# Altium PCB HFPB_01-PCB.PcbDoc (part 2 of 5)
Units mm, origin at the board's own origin, x right, y up, seen from the top; angles counter-clockwise.
Board outline 125 x 200 mm, 8 copper layers (Top Layer, Signal Layer 1, Signal Layer 2, Signal Layer 3, Signal Layer 4, Signal Layer 5, Signal Layer 6, Bottom Layer), stack 1.53 mm thick; 382 components, 179 nets, 1080 pads, 272 vias.
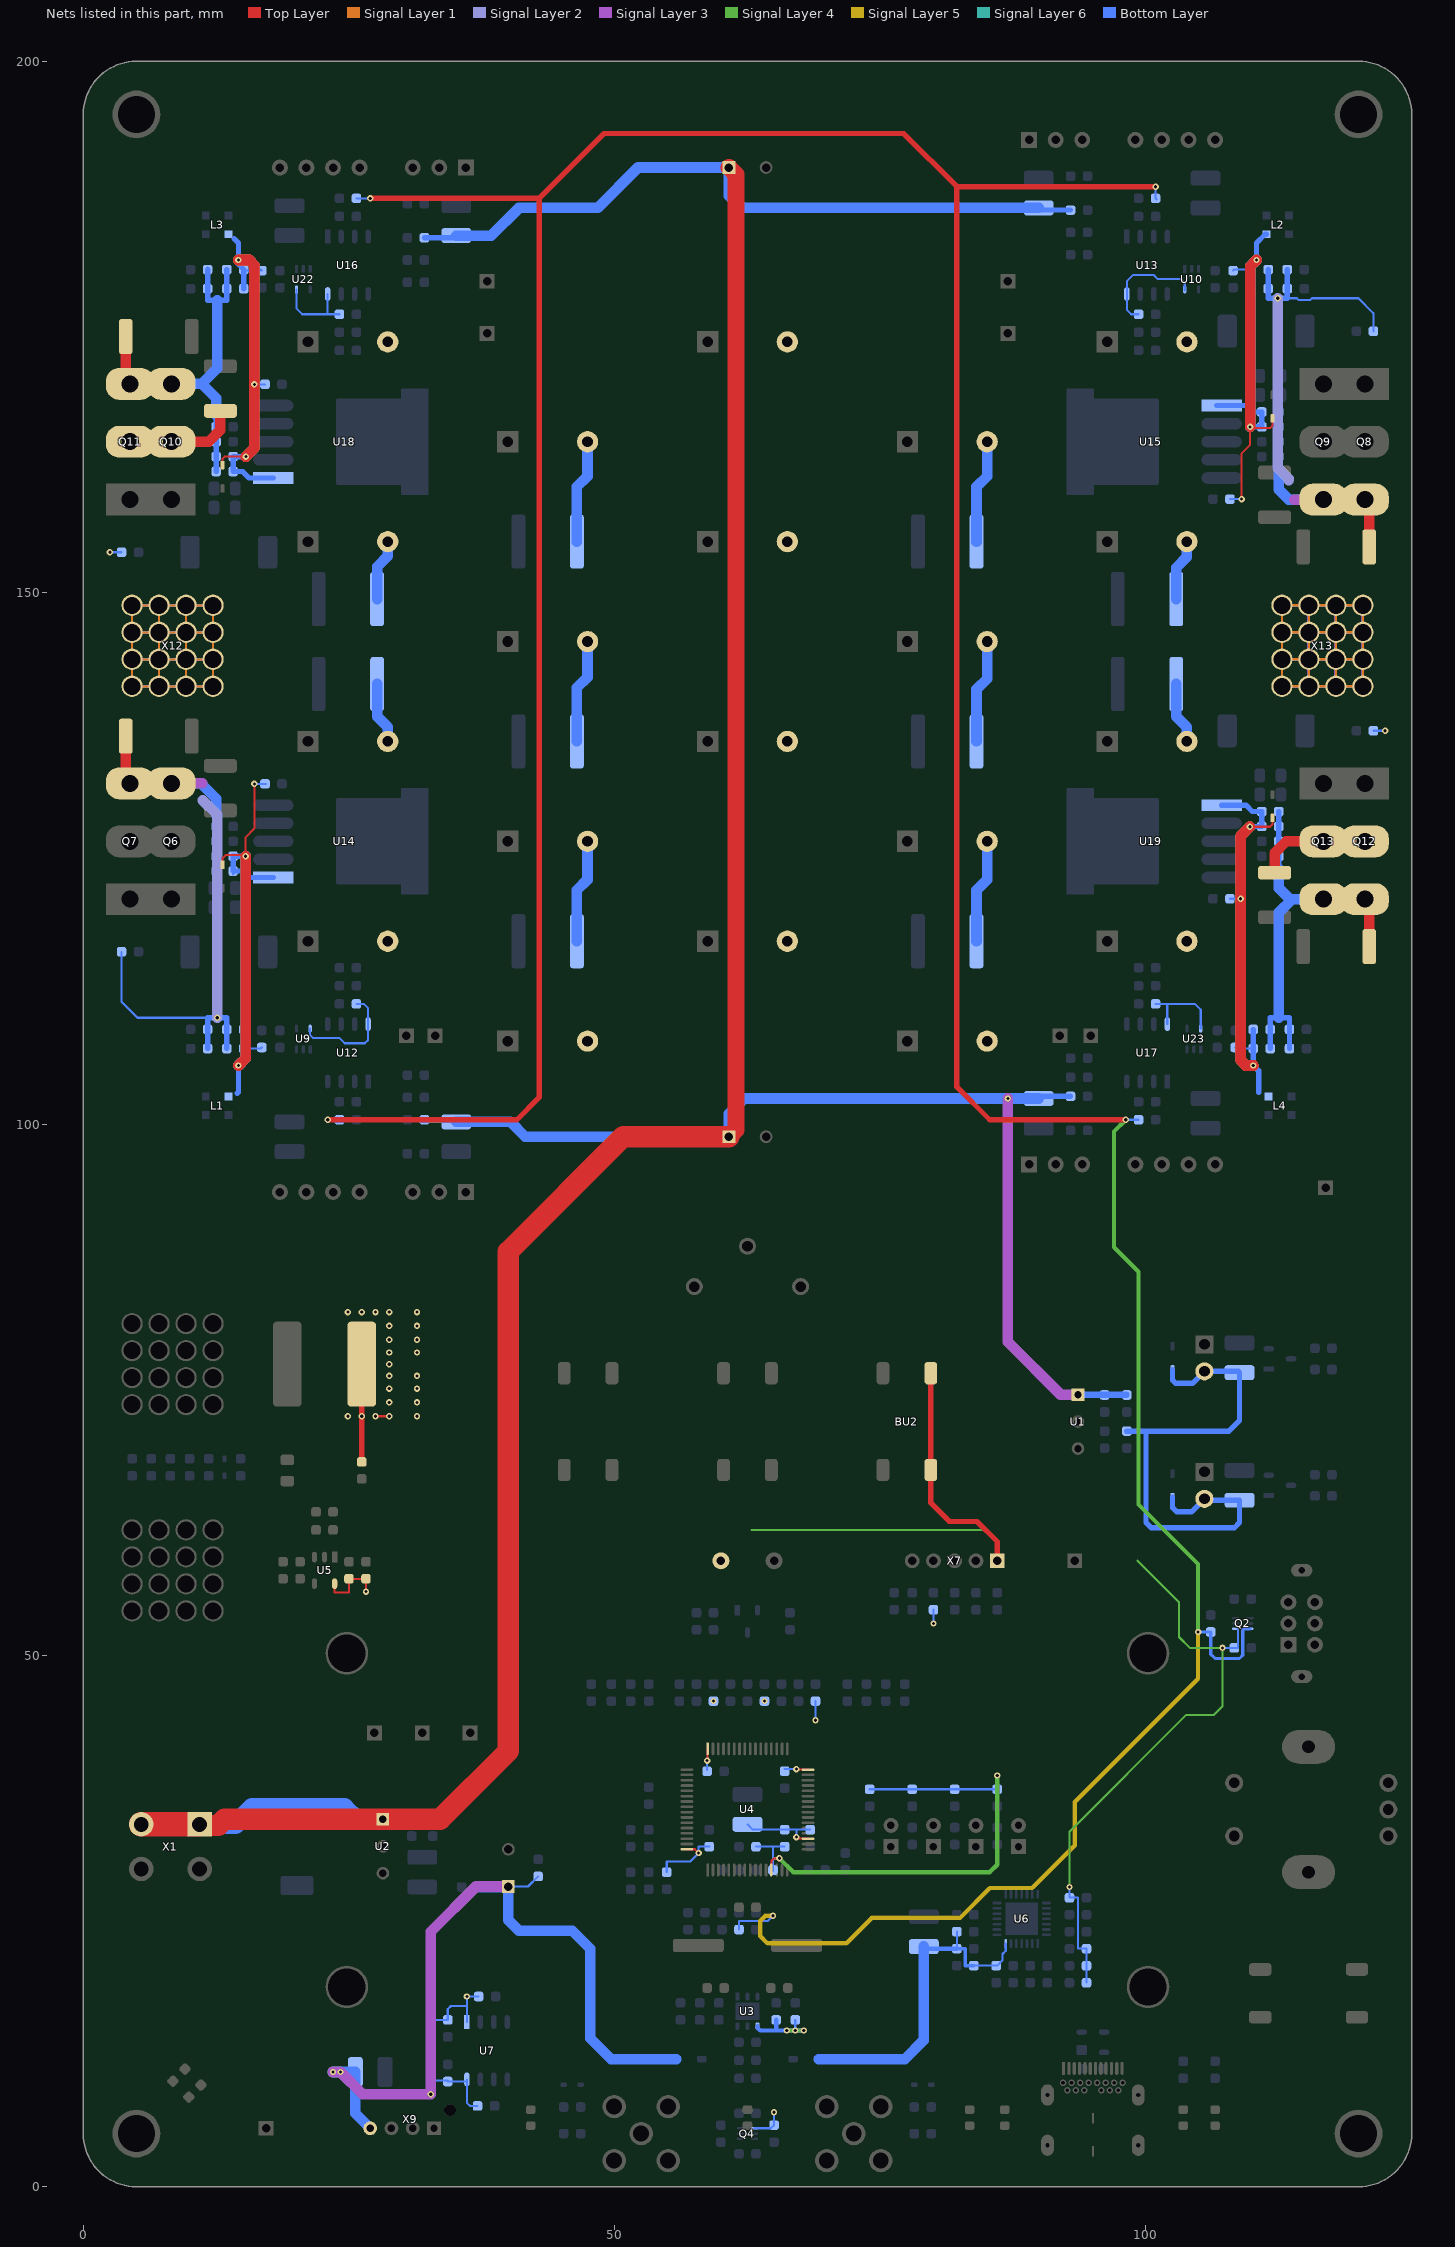
[diagram p8: the nets of this part, all layers, seen from the top]

## Part data
BR1: "Encoder Mechanical 16 PPR", Manufacturer=BOURNS, Package/Case="Through Hole", CompType=Switch, Datasheet link=https://www.bourns.com/docs/Product-Datasheets/PEC11H.pdf, Digikey link=https://www.digikey.com/en/products/detail/bourns-inc/PEC11H-4020F-S0016/12349534?s=N4IgTCBcDaIAoFEDCBGFAJAtAFgAxlwDFMBlXXFANhAF0BfIA, Digikey number=118-PEC11H-4020F-S0016-ND, Mouser link=https://www.mouser.com/ProductDetail/Bourns/PEC11H-4020F-S0016?qs=%2Fha2pyFadugXOIYgpT6d2kofLXwYK1YHwuBrkfy8sJ82SNO9kJXzL6bNe4VLuBIA, Mouser number=652-PEC11H4020FS0016, Part Description="Encoder Mechanical 16 PPR", Part number=PEC11H-4020F-S0016, Price per 1p (1), $=2.75, Price per 1p (1000), $=1.5
BU1 BU2 BU3 BU4: "Switch tactile OFF-(ON) 0.05A 24V", Manufacturer="TE Connectivity", Package/Case="SMD 6.0x6.00", CompType=Switch, Datasheet link=https://www.te.com/commerce/DocumentDelivery/DDEController?Action=srchrtrv&DocNm=2-1437565-7&DocType=Customer+Drawing&DocLang=English, Digikey link=https://www.digikey.com/product-detail/en/te-connectivity-alcoswitch-switches/1571563-8/450-2056-1-ND/4569746, Digikey number=450-2056-1-ND, Mouser link=https://www.mouser.com/ProductDetail/TE-Connectivity-PB/1571563-8?qs=%2Fha2pyFaduj0OuietpPA40kWGM%2FYIDp1pjMEPmW2uQg=, Mouser number=506-1571563-8, Part Description="Switch tactile 6.0x6.0x5.0mm", Part number=1571563-8, Price per 1p (1), $=0.3, Price per 1p (1000), $=0.2
C1 C14 C38 C83 C84 C88 C91 C128 C129 C131 C134: library part C1210, "Capacitor 1210", Manufacturer=KEMET, Package/Case=SMD1210, Part number=C1210C106M6PACTU, Value1=20%, Value2=X5R, Value3=35V, CompType=Capacitor, Datasheet link=https://content.kemet.com/datasheets/KEM_C1006_X5R_SMD.pdf, Digikey link=https://www.digikey.com/en/products/detail/kemet/C1210C106M6PACTU/1950669, Digikey number=399-5509-1-ND, Mouser link=https://www.mouser.com/ProductDetail/KEMET/C1210C106M6PACTU?qs=%2Fha2pyFaduiE5F3NeAx%252BstNZ0BfneUhBxisAs3aM8TbgY%252BzsDA%2Fe1Q%3D%3D, Mouser number=80-C1210C106M6P, Part Description="Ceramic 10uF 20% X5R 35V", Price per 1p (1), $=0.96, Price per 1p (1000), $=0.32
C2 C8 C82 C85 C127 C130: library part C0603, "Capacitor 0603", Manufacturer=Murata, Package/Case=SMD0603, Part number=GRT188R61H105KE13D, Value1=10%, Value2=X5R, Value3=50V, CompType=Capacitor, Datasheet link=https://search.murata.co.jp/Ceramy/image/img/A01X/G101/ENG/GRT188R61H105KE13-01.pdf, Digikey link=https://www.digikey.com/en/products/detail/murata-electronics/GRT188R61H105KE13D/5416752, Digikey number=490-12330-1-ND, Mouser link=https://www.mouser.com/ProductDetail/Murata-Electronics/GRT188R61H105KE13D?qs=%2Fha2pyFaduhFE6YphrUpxtZHcvtFLtW5%252BvZuAhz4RSuwDm7lX%252BAYM08BAcXMzrSJ, Mouser number=81-GRT188R61H105KE3D, Part Description="Ceramic 1uF 10% X5R 50V", Price per 1p (1), $=0.26, Price per 1p (1000), $=0.05
C3 C9: library part C0603, "Capacitor 0603", Manufacturer=KEMET, Package/Case=SMD0603, Part number=C0603C104K5RAC7082, Value1=10%, Value2=X7R, Value3=50V, CompType=Capacitor, Datasheet link=https://content.kemet.com/datasheets/KEM_C1002_X7R_SMD.pdf, Digikey link=https://www.digikey.com/en/products/detail/kemet/C0603C104K5RAC7082/12701309, Digikey number=399-C0603C104K5RAC7082CT-ND, Mouser link=https://www.mouser.com/ProductDetail/KEMET/C0603C104K5RAC7082?qs=%2Fha2pyFadugh8U7pV%252BrBGqKQVo7gfMZW%2Fweu8z7AvYympDvL%2Flu68oQ8xJ7whdD7, Mouser number=80-C0603C104K5R7082, Part Description="Ceramic 0.1uF 10% X7R 50V", Price per 1p (1), $=0.12, Price per 1p (1000), $=0.02
C4 C12 C17 C21 C28 C80 C81 C100 C103 C116 C119 C125 C126: library part C0603, "Capacitor 0603", Manufacturer=TDK, Package/Case=SMD0603, Part number=C1608X7R1E105K080AB, Value1=10%, Value2=X7R, Value3=25V, CompType=Capacitor, Datasheet link=https://product.tdk.com/en/system/files?file=dam/doc/product/capacitor/ceramic/mlcc/catalog/mlcc_commercial_general_en.pdf, Digikey link=https://www.digikey.com/en/products/detail/tdk-corporation/C1608X7R1E105K080AB/2443434, Digikey number=445-5956-1-ND, Mouser link=https://www.mouser.com/ProductDetail/TDK/C1608X7R1E105K080AB?qs=%2Fha2pyFaduhbvUZXXxHSPKihux7pk%2FWVkCyG6jxauGMJh0GxUX0uaQUYqa1ofngF, Mouser number=810-C1608X7R1E105K, Part Description="Ceramic 1uF 10% X7R 25V", Price per 1p (1), $=0.21, Price per 1p (1000), $=0.04
C5 C6: library part RL81V101MDN1KX, "Capacitor Polymer Radial 100µF 35V 25mOhm", Manufacturer=Nichicon, Package/Case="Radial, T/H 8.0x8.0", Value1=2000h, Value2=25mOhm, Value3=35V, Alternative="B41851F7227M000, JRB1V221M03500800120000B", CompType=Capacitor, Datasheet link=http://nichicon-us.com/english/products/pdfs/e-rl8.pdf, Digikey link=https://www.digikey.com/product-detail/en/nichicon/RL81V101MDN1KX/493-6630-1-ND/3466042, Digikey number=493-6630-1-ND, Mouser link=https://www.mouser.com/ProductDetail/Nichicon/RL81V101MDN1KX?qs=%2Fha2pyFadujp0wmh1eHJ4ZrOTMwlEdyH9TEHOdF6JjuEMP2hoF4V1g%3D%3D, Mouser number=647-RL81V101MDN1KX, Part Description="Polymer Radial 100µF 20% 35V 25mOhm 2000h", Part number=RL81V101MDN1KX, Price per 1p (1), $=2.16, Price per 1p (1000), $=0.8
C7 C13 C15 C19 C20 C26 C30 C40 C43 C45 C46 C47 C48 C49 C94 C95 C110 C111 C124: library part C0603, "Capacitor 0603", Manufacturer=Murata, Package/Case=SMD0603, Part number=GRM1885C1H103JA01D, Value1=5%, Value2=NP0, Value3=50V, CompType=Capacitor, Datasheet link=https://www.murata.com/-/media/webrenewal/support/library/catalog/products/capacitor/ceramiccapacitor/c02e.ashx?la=en-us&cvid=20210120024548000000, Digikey link=https://www.digikey.com/en/products/detail/murata-electronics/GRM1885C1H103JA01D/4421555, Digikey number=490-9666-1-ND, Mouser link=https://www.mouser.com/ProductDetail/Murata-Electronics/GRM1885C1H103JA01D?qs=%2Fha2pyFadug%2FvrC4VCXnldPdhfCgZBWBzBuM%2F5wKCqYfrzyFGWQkMbFjDTwqfUhJ, Mouser number=81-GRM1885C1H103JA1D, Part Description="Ceramic 0.01uF 5% NP0 50V", Price per 1p (1), $=0.2, Price per 1p (1000), $=0.04
C10 C25 C34: library part C1210, "Capacitor 1210", Manufacturer=KEMET, Package/Case=SMD1210, Part number=C1210C107M8PACTU, Value1=20%, Value2=X5R, Value3=10V, CompType=Capacitor, Datasheet link=https://content.kemet.com/datasheets/KEM_C1006_X5R_SMD.pdf, Digikey link=https://www.digikey.com/en/products/detail/kemet/C1210C107M8PACTU/4918884, Digikey number=399-11631-1-ND, Mouser link=https://www.mouser.com/ProductDetail/KEMET/C1210C107M8PACTU?qs=%2Fha2pyFaduiE5F3NeAx%252BsprSoAdidwO3b%2FrC%252BOmtqFrT1TfrhYgUKA%3D%3D, Mouser number=80-C1210C107M8P, Part Description="Ceramic 100uF 20% X5R 10V", Price per 1p (1), $=1.50, Price per 1p (1000), $=0.6
C11: library part RL81C331MDN1KX, "Capacitor Polymer Radial 330µF 16V 12mOhm", Manufacturer=Nichicon, Package/Case="Radial, T/H 9.0x8.0", Value1=2000h, Value2=12mOhm, Value3=16V, Alternative=JRB1C681M03500800160000B, CompType=Capacitor, Datasheet link=https://www.nichicon.co.jp/english/products/pdfs/e-rl8.pdf, Digikey link=https://www.digikey.com/en/products/detail/nichicon/RL81C331MDN1KX/3466040, Digikey number=493-6629-1-ND, Mouser link=https://www.mouser.com/ProductDetail/Nichicon/RL81C331MDN1KX?qs=%2Fha2pyFaduhK%2FlJqlBZNyQmMLaxQ8Su7%2FtHua9Btrb7RIgwkKaRsaw%3D%3D, Mouser number=647-RL81C331MDN1KX, Part Description="Polymer Radial 330µF 20% 16V 12mOhm 2000h", Part number=RL81C331MDN1KX, Price per 1p (1), $=0.99, Price per 1p (1000), $=0.34
C16 C18 C22 C23 C24 C27 C29 C31 C32 C33 C35 C36 C37 C39 C44 C86 C87 C92 C93 C101 C102 C105 C106 C108 C109 C117 C118 C121 C122 C135 C136: library part C0603, "Capacitor 0603", Manufacturer=KEMET, Package/Case=SMD0603, Part number=C0603C104K3RAC7082, Value1=10%, Value2=X7R, Value3=25V, CompType=Capacitor, Datasheet link=https://content.kemet.com/datasheets/KEM_C1002_X7R_SMD.pdf, Digikey link=https://www.digikey.com/en/products/detail/kemet/C0603C104K3RAC7082/12700954, Digikey number=399-C0603C104K3RAC7082CT-ND, Mouser link=https://www.mouser.com/ProductDetail/KEMET/C0603C104K3RAC7082?qs=%2Fha2pyFadugh8U7pV%252BrBGp7heQ7z29T%252BvsWVbXyCAC0knLhltr70Nk4q6OvfRKW6, Mouser number=80-C0603C104K3R7082, Part Description="Ceramic 0.1uF 10% X7R 25V", Price per 1p (1), $=0.11, Price per 1p (1000), $=0.02
C41 C42: library part C0603, "Capacitor 0603", Manufacturer=KEMET, Package/Case=SMD0603, Part number=C0603C270J5GAC7411, Value1=5%, Value2=NP0, Value3=50V, CompType=Capacitor, Datasheet link=https://content.kemet.com/datasheets/KEM_C1003_C0G_SMD.pdf, Digikey link=https://www.digikey.com/en/products/detail/kemet/C0603C270J5GAC7411/12701403, Digikey number=399-C0603C270J5GAC7411CT-ND, Mouser link=https://www.mouser.com/ProductDetail/KEMET/C0603C270J5GAC7411?qs=%2Fha2pyFadui%252BlANwcvT18Zoh%252BwF%2FE0d%252B6131%2FziVj6iI7zgg%252B0HeRg%3D%3D, Mouser number=80-C0603C270J5GACLR, Part Description="Ceramic 27pF 5% NP0 50V", Price per 1p (1), $=0.10, Price per 1p (1000), $=0.01
C50 C51 C52 C53 C54 C55 C56 C57 C58 C59 C60 C61 C62 C63 C64 C65 C66 C67 C68 C69: library part EEU-FC2A681, "Capacitor Aluminum Electrolytic Radial 680µF 100V 36mOhm", Manufacturer=Panasonic, Package/Case="Radial, T/H 40.0x18.0", Value1=5000h, Value2=36mOhm, Value3=100V, CompType=Capacitor, Datasheet link=https://industrial.panasonic.com/cdbs/www-data/pdf/RDF0000/ABA0000C1209.pdf, Digikey link=https://www.digikey.com/en/products/detail/panasonic-electronic-components/EEU-FC2A681/285738?s=N4IgTCBcDaIKJwKoFoBiBhMBBAbADgEYQBdAXyA, Digikey number=P10875-ND, Mouser link=https://www.mouser.com/ProductDetail/Panasonic/EEU-FC2A681?qs=%2Fha2pyFaduhEQn%252Bb0FuXjefFIggaKnk9L%252B3cS5CzWh0%3D, Mouser number=667-EEU-FC2A681, Part Description="Polymer Radial 100µF 20% 35V 25mOhm 2000h", Part number=EEU-FC2A681, Price per 1p (1), $=3.0, Price per 1p (1000), $=1.2
C70 C71 C72 C73 C74 C75 C76 C77 C78 C79: library part C2220, "Capacitor 2220", Manufacturer=KEMET, Package/Case=SMD2220, Part number=C2220C105KARACTU, Value1=10%, Value2=X7R, Value3=250V, CompType=Capacitor, Datasheet link=https://content.kemet.com/datasheets/KEM_C1011_X7R_TIP_RING_SMD.pdf, Digikey link=https://www.digikey.com/en/products/detail/kemet/C2220C105KARACTU/992183, Digikey number=399-4690-1-ND, Mouser link=https://www.mouser.com/ProductDetail/KEMET/C2220C105KARACTU?qs=%2Fha2pyFaduhp05YE4c39qqkzok8yt%252BLJtgtCCdYW7hoIomCxB7M0sA%3D%3D, Mouser number=80-C2220C105KAR, Part Description="Ceramic 1uF 10% X7R 250V", Price per 1p (1), $=2.20, Price per 1p (1000), $=0.90
C89: library part C0603, "Capacitor 0603", Manufacturer=TDK, Package/Case=SMD0603, Part number=C1608X5R1E225K080AB, Value1=10%, Value2=X5R, Value3=25V, CompType=Capacitor, Datasheet link=https://product.tdk.com/en/system/files?file=dam/doc/product/capacitor/ceramic/mlcc/catalog/mlcc_commercial_general_en.pdf, Digikey link=https://www.digikey.com/en/products/detail/tdk-corporation/C1608X5R1E225K080AB/2443442, Digikey number=445-5964-1-ND, Mouser link=https://www.mouser.com/ProductDetail/TDK/C1608X5R1E225K080AB?qs=%2Fha2pyFaduirP9TymlGUul4f6A1oFNb6hTiY2LH9rXsl5JRxF%2FJ6mL29Xdq17qTS, Mouser number=810-C1608X5R1E225K, Part Description="Ceramic 2.2uF 10% X5R 25V", Price per 1p (1), $=0.25, Price per 1p (1000), $=0.05
C90 C104 C107 C120 C123 C132 C133: library part C0603, "Capacitor 0603", Manufacturer=TDK, Package/Case=SMD0603, Part number=C1608X5R1E225K080AB, Value1=10%, Value2=X7R, Value3=25V, CompType=Capacitor, Datasheet link=https://product.tdk.com/en/system/files?file=dam/doc/product/capacitor/ceramic/mlcc/catalog/mlcc_commercial_general_en.pdf, Digikey link=https://www.digikey.com/en/products/detail/tdk-corporation/C1608X5R1E225K080AB/2443442, Digikey number=445-5964-1-ND, Mouser link=https://www.mouser.com/ProductDetail/TDK/C1608X5R1E225K080AB?qs=%2Fha2pyFaduirP9TymlGUul4f6A1oFNb6hTiY2LH9rXsl5JRxF%2FJ6mL29Xdq17qTS, Mouser number=810-C1608X5R1E225K, Part Description="Ceramic 2.2uF 10% X5R 25V", Price per 1p (1), $=0.25, Price per 1p (1000), $=0.05
C96 C97 C112 C113: library part C1812, "Capacitor 1812", Manufacturer=TDK, Package/Case=SMD1812, Part number=CGA8M1C0G3F221K200KA, Value1=10%, Value2=NP0, Value3=3kV, CompType=Capacitor, Datasheet link=https://product.tdk.com/en/system/files?file=dam/doc/product/capacitor/ceramic/mlcc/catalog/mlcc_automotive_highvoltage_en.pdf, Digikey link=https://www.digikey.com/en/products/detail/tdk-corporation/CGA8M1C0G3F221K200KA/3950330, Digikey number=445-13094-1-ND, Mouser link=https://www.mouser.com/ProductDetail/TDK/CGA8M1C0G3F221K200KA?qs=%2Fha2pyFadugRRZizCtF2bm6WjA5tvQdmbPUGLoma1JzK%252BCjwN9QqlbtkTq4JdeNm, Mouser number=810-CGA8M1C0G3F221KA, Part Description="Ceramic 220pF 10% NP0 3kV", Price per 1p (1), $=0.93, Price per 1p (1000), $=0.34
C98 C99 C114 C115: library part C0603, "Capacitor 0603", Manufacturer=Murata, Package/Case=SMD0603, Part number=GRM1885C1H100JA01D, Value1=5%, Value2=NP0, Value3=50V, CompType=Capacitor, Datasheet link=https://www.murata.com/-/media/webrenewal/support/library/catalog/products/capacitor/ceramiccapacitor/c02e.ashx?la=en-us&cvid=20210120024548000000, Digikey link=https://www.digikey.com/en/products/detail/murata-electronics/GRM1885C1H100JA01D/586930, Digikey number=490-1403-1-ND, Mouser link=https://www.mouser.com/ProductDetail/Murata-Electronics/GRM1885C1H100JA01D?qs=%2Fha2pyFadug%2FvrC4VCXnlbJmrOFMaxj30QUgA6YXUVlxuM%2FhvX8xlA%3D%3D, Mouser number=81-GRM39C100D50, Part Description="Ceramic 10pF 5% NP0 50V", Price per 1p (1), $=0.12, Price per 1p (1000), $=0.02
D1 D7 D10 D11 D14 D15: "Diode Schottky 30V 0.2A", Manufacturer=Nexperia, Package/Case=SOD-323F, Value1=0.2A, Value2=0.8V, Value3=-, CompType=Diode, Datasheet link=https://rocelec.widen.net/view/pdf/es9ugfukaw/PHGLS14913-1.pdf?t.download=true&u=5oefqw, Digikey link=https://www.digikey.com/en/products/detail/nexperia-usa-inc/BAT54J-115/1692654, Digikey number=1727-4818-1-ND, Mouser link=https://www.mouser.com/ProductDetail/Nexperia/BAT54J115?qs=%2Fha2pyFadugI9ADa6WxEnxQzp3xOrOvOo4yhxZudU23LhjKFM4l8YQ%3D%3D, Mouser number=771-BAT54J115, Part Description="Diode Schottky 30V 0.2A", Part number=BAT54J,115, Price per 1p (1), $=0.24, Price per 1p (1000), $=0.04
D2 D12 D13 D16 D17: "Diode Schottky 40V 5A", Manufacturer="ON Semiconductor", Package/Case=SMC, Value1=5A, Value2=0.5V, Value3=-, CompType=Diode, Datasheet link=https://www.onsemi.com/pdf/datasheet/mbrs540t3-d.pdf, Digikey link=https://www.digikey.com/en/products/detail/on-semiconductor/MBRS540T3G/918647, Digikey number=MBRS540T3GOSCT-ND, Mouser link=https://www.mouser.com/ProductDetail/ON-Semiconductor/MBRS540T3G?qs=%2Fha2pyFaduhC0LQdY%2FqVaee8bZnksvp1EwMnsoQeoVc%3D, Mouser number=863-MBRS540T3G, Part Description="Diode Schottky 40V 5A", Part number=MBRS540T3G, Price per 1p (1), $=0.53, Price per 1p (1000), $=0.2
D3 D4: "Diode Schottky 10V 3A", Manufacturer=STM, Package/Case=SOD-323, Value1=3A, Value2=0.58V, Value3=-, CompType=Diode, Datasheet link=https://www.st.com/content/ccc/resource/technical/document/datasheet/3d/d2/27/1d/20/e3/4d/48/CD00001944.pdf/files/CD00001944.pdf/jcr:content/translations/en.CD00001944.pdf, Digikey link=https://www.digikey.com/en/products/detail/stmicroelectronics/BAT60JFILM/686386?s=N4IgTCBcDaIEIEEAqA2ADAKQGIEkAyAsiALoC%2BQA, Digikey number=497-3707-1-ND, Mouser link=https://www.mouser.com/ProductDetail/STMicroelectronics/BAT60JFILM?qs=%2Fha2pyFadugkQQnfwhC%2FYlghszO9A%2FCVKvGNi1XWJVA%3D, Mouser number=511-BAT60JFILM, Part Description="Diode Schottky 10V 3A", Part number=BAT60JFILM, Price per 1p (1), $=0.32, Price per 1p (1000), $=0.06
D5 D6 D8: "TVS Diode Vstand=3.3V Vclamp=10V", Manufacturer="Diodes Inc.", Package/Case=SOD-523, Value1=Vbr=6V, Value2=Vcl=10V, Value3=5A, CompType="TVS Diode", Datasheet link=https://www.diodes.com/assets/Datasheets/D1213A-01T.pdf, Digikey link=https://www.digikey.com/en/products/detail/diodes-incorporated/d1213a-01t-7/3340396, Digikey number=D1213A-01T-7DICT-ND, Mouser link=https://www.mouser.fi/ProductDetail/Diodes-Incorporated/D1213A-01T-7?qs=%2Fha2pyFadugTbXyDDJCBKr26BLlAlDs3op5XjdvY%2F2Ix7eZK8W%2F%2Fgg%3D%3D, Mouser number=621-D1213A-01T-7, Part Description="TVS Diode Vstand=5.5V Vclamp=10V", Part number=D1213A-01T-7, Price per 1p (1), $=0.36, Price per 1p (1000), $=0.055
D9: "TVS Diode Vstand=5.5V Vbr=11V", Manufacturer="Texas Instruments", Package/Case=SOP-4, Value1=Vbr=11V, Value2=Vcl=25V, Value3=10A, CompType="TVS Diode", Datasheet link=https://www.ti.com/lit/ds/symlink/tpd2e001.pdf?HQS=dis-dk-null-digikeymode-dsf-pf-null-wwe&ts=1616116107965, Digikey link=https://www.digikey.com/en/products/detail/texas-instruments/TPD2E001DZDR/1907454?s=N4IgTCBcDaICoAUAiYCiAGdBGJAtJASiALoC%2BQA, Digikey number=296-24770-1-ND, Mouser link=https://www.mouser.com/ProductDetail/Texas-Instruments/TPD2E001DZDR?qs=%2Fha2pyFaduhRqoDPSuaK9MWyVlIH1BetI3XLYDxSpsH9UYZtlK%2FvQA%3D%3D, Mouser number=595-TPD2E001DZDR, Part Description="TVS Diode Vstand=5.5V Vbr=11V", Part number=TPD2E001DZDR, Price per 1p (1), $=0.62, Price per 1p (1000), $=0.24
FB1 FB2 FB3 FB4 FB5 FB6 FB7 FB8 FB9 FB10 FB11 FB12 FB13 FB14 FB15 FB16 FB17: library part MPZ1608S601ATA00, "Ferrite Bead 600Ohms 1A", Manufacturer=TDK, Package/Case=SMD0603, Value1=1A, Value2=150mOhm, CompType="Ferrite Bead", Datasheet link=https://product.tdk.com/info/en/catalog/datasheets/beads_commercial_power_mpz1608_en.pdf, Digikey link=https://www.digikey.com/product-detail/en/tdk-corporation/MPZ1608S601ATA00/445-2205-1-ND/765103, Digikey number=445-2205-1-ND, Mouser link=https://www.mouser.com/ProductDetail/TDK/MPZ1608S601ATA00?qs=%2Fha2pyFadugcsOiFyIs3PqyLV4WV7NzmPQY%252BV8Rm%2F551LUqkOqXlQw%3D%3D, Mouser number=810-MPZ1608S601ATA00, Part Description="Ferrite Bead 600Ohms 1A", Part number=MPZ1608S601ATA00, Price per 1p (1), $=0.1, Price per 1p (1000), $=0.027
H1 H2 H3 H4: library part HOLE/3.5, "HOLE 3.5mm", Package/Case=-, Value1=3.5mm, Value2=4.5mm, CompType=Hole, Part Description="Mounting hole"
L1 L2 L3 L4: "Common Mode Choke 2 lines 1.4kOhm 2A 56mOhm", Manufacturer=Murata, Package/Case=SMD-4, Value1=2A, Value2=56mOhm, Value3=0.2Ohm, CompType=Inductor, Datasheet link=https://www.murata.com/en-us/products/productdata/8796761587742/EFLC0025.pdf, Digikey link=https://www.digikey.com/en/products/detail/murata-electronics/DLW5BTM142TQ2L/4421377?s=N4IgTCBcDaICIBkDqBWAQgFQLIEYAsYGAimAiALoC%2BQA, Digikey number=490-11110-1-ND, Mouser link=https://www.mouser.com/ProductDetail/Murata-Electronics/DLW5BTM142TQ2L?qs=eTNEoJdcnEJfMtnluA8TOg%3D%3D, Mouser number=81-DLW5BTM142TQ2L, Part Description="Common Mode Choke 2 lines 1.4kOhm 2A 56mOhm", Part number=DLW5BTM142TQ2L, Price per 1p (1), $=1.7, Price per 1p (1000), $=0.6
LD1: library part LED0603, "LED 0603", Manufacturer="Lite-On Inc.", Package/Case=SMD0603, Value1=571nm, Value2=16mcd, Value3=Vf=2.0V, CompType=LED, Datasheet link=http://optoelectronics.liteon.com/upload/download/DS22-2007-0094/LTST-C193KGKT-5A.PDF, Digikey link=https://www.digikey.com/product-detail/en/lite-on-inc/LTST-C193KGKT-5A/160-1828-1-ND/2356247, Digikey number=160-1828-1-ND, Mouser link=https://www.mouser.com/ProductDetail/Lite-On/LTST-C193KGKT-5A?qs=%2Fha2pyFadui2fuz%252BskZlf%252BBKeUrzEFlJSpsEN%252B8irLCHIpuJXYY%252BoHVc4IEmyhNX, Mouser number=859-LTSTC193KGKT5A, Part Description="LED Green 5mA 572nm Vf=2.0V", Part number=LTST-C193KGKT-5A, Price per 1p (1), $=0.39, Price per 1p (1000), $=0.07, Text="\"POWER ON\""
LD2 LD5 LD6: library part LED0603, "LED 0603", Manufacturer="Lite-On Inc.", Package/Case=SMD0603, Value1=591nm, Value2=26mcd, Value3=Vf=2.0V, CompType=LED, Datasheet link=https://optoelectronics.liteon.com/upload/download/DS22-2004-141/LTST-C193KSKT-5A.PDF, Digikey link=https://www.digikey.com/en/products/detail/lite-on-inc/LTST-C193KSKT-5A/2356245?s=N4IgTCBcDaIDIBUDKCC0BhAjATgMwGkl80BWAQRAF0BfIA, Digikey number=160-1831-1-ND, Mouser number=859-LTSTC193KSKT5A, Part Description="LED Yellow 5mA 591nm Vf=2.0V", Part number=LTST-C193KSKT-5A, Price per 1p (1), $=0.39, Price per 1p (1000), $=0.07
  LD2: Mouser link=https://www.mouser.com/ProductDetail/Lite-On/LTST-C193KSKT-5A?qs=%2Fha2pyFadui2fuz%252BskZlf1hOnU5QqX00n%2FRxwoxNLBz4AohNkvyHxzVm0wtLxusQ, Text="\"Pulse\""
  LD5: Mouser link=https://www.mouser.com/ProductDetail/Lite-On/LTST-C193KSKT-5A?qs=%2Fha2pyFadui2fuz%252BskZlf1hOnU5QqX00n%2FRxwoxNLBz4AohNkvyHxzVm0wtLxusQ, Text="\"RxD\""
  LD6: Mouser link=https://www.mouser.fi/ProductDetail/Lite-On/LTST-C193KGKT-5A?qs=%2Fha2pyFaduj%252BwTWyfQGTE%252BESNN%2FIL38crV%2FDXvNUmN0LgmZ52X3LRw%3D%3D, Text="\"TxD\""
LD3: library part LED0603, "LED 0603", Manufacturer="Lite-On Inc.", Package/Case=SMD0603, Value1=605nm, Value2=26mcd, Value3=Vf=2.0V, CompType=LED, Datasheet link=https://optoelectronics.liteon.com/upload/download/DS22-2010-0196/LTST-C194KFKT.PDF, Digikey link=https://www.digikey.com/en/products/detail/lite-on-inc/LTST-C194KFKT/2356222?s=N4IgTCBcDaIDIBUDKCC0BhAjATgCwGkAxfBEAXQF8g, Digikey number=160-1833-1-ND, Mouser link=https://www.mouser.com/ProductDetail/Lite-On/LTST-C194KFKT?qs=%2Fha2pyFaduj%252BwTWyfQGTE1xnFUK4HpR8ri82Lpi85EDthVVjzq7S1A%3D%3D, Mouser number=859-LTST-C194KFKT, Part Description="LED Orange 5mA 605nm Vf=2.0V", Part number=LTST-C194KFKT, Price per 1p (1), $=0.39, Price per 1p (1000), $=0.07, Text="\"Warning\""
LD4: library part LED0603, "LED 0603", Manufacturer="Lite-On Inc.", Package/Case=SMD0603, Value1=631nm, Value2=26mcd, Value3=Vf=2.0V, CompType=LED, Datasheet link=https://optoelectronics.liteon.com/upload/download/DS22-2005-077/LTST-C193KRKT-5A.PDF, Digikey link=https://www.digikey.com/en/products/detail/lite-on-inc/LTST-C193KRKT-5A/2356244?s=N4IgTCBcDaIDIBUDKCC0BhAjATgMwGkAlfNAVgEEQBdAXyA, Digikey number=160-1830-1-ND, Mouser link=https://www.mouser.fi/ProductDetail/Lite-On/LTST-C193KGKT-5A?qs=%2Fha2pyFaduj%252BwTWyfQGTE%252BESNN%2FIL38crV%2FDXvNUmN0LgmZ52X3LRw%3D%3D, Mouser number=859-LTSTC193KRKT5A, Part Description="LED Red 5mA 631nm Vf=2.0V", Part number=LTST-C193KRKT-5A, Price per 1p (1), $=0.39, Price per 1p (1000), $=0.07, Text="\"Error\""
LS1: "Buzzer Magnetic Audio Indicator 5V 80dB 2.7kHz", Manufacturer=CUI, Package/Case="Through hole 9.6x5.0", CompType=Buzzer, Datasheet link=https://www.mouser.fi/datasheet/2/670/cmi-9605ic-0580t-1777058.pdf, Digikey link=https://www.digikey.com/product-detail/en/cui-devices/CMI-9605IC-0580T/2223-CMI-9605IC-0580T-ND/11674175, Digikey number=2223-CMI-9605IC-0580T-ND, Mouser link=https://www.mouser.fi/ProductDetail/CUI-Devices/CMI-9605IC-0580T?qs=%2Fha2pyFaduiWDziRe0pUkXmI24fbhN7%252BQ5ghD9GyA1o5501nVMK8eg%3D%3D, Mouser number=490-CMI-9605IC-0580T, Part Description="Buzzer Magnetic  5V 80dB 2.7kHz", Part number=CMI-9605IC-0580T, Price per 1p (1), $=1.41, Price per 1p (1000), $=0.77
Q1 Q3 Q5: "MOSFET N-channel, 20V, 21mOhm", Manufacturer=Infineon, Package/Case=SOT23-3, CompType=Transistor, Datasheet link=https://www.infineon.com/dgdl/irlml6244pbf.pdf?fileId=5546d462533600a4015356686fed261f, Digikey link=https://www.digikey.com/en/products/detail/infineon-technologies/IRLML6244TRPBF/2393871?s=N4IgTCBcDaIJICUAyBZJA2MAWLAVBACgEIBiIAugL5A, Digikey number=IRLML6244TRPBFCT-ND, Mouser link=https://www.mouser.com/ProductDetail/Infineon-IR/IRLML6244TRPBF?qs=%2Fha2pyFadujeyBzDqaIaJ4NUAEeLSDgUw%2FRWGzjYGSnNi7hxyn4IcA%3D%3D, Mouser number=942-IRLML6244TRPBF, Part Description="MOSFET N-channel, 20V, 21mOhm", Part number=IRLML6244TRPBF, Price per 1p (1), $=0.43, Price per 1p (1000), $=0.13
Q2 Q4: "Transistors N-channel, P-channel (Dual) MOSFET, 20V, 1A", Manufacturer="Diodes Inc.", Package/Case=SOT-563, CompType=Transistor, Datasheet link=https://www.diodes.com/assets/Datasheets/DMC2400UV.pdf, Digikey link=https://www.digikey.com/product-detail/en/diodes-incorporated/DMC2400UV-7/DMC2400UV-7DICT-ND/2918407, Digikey number=DMC2400UV-7DICT-ND, Mouser link=https://www.mouser.com/ProductDetail/Diodes-Incorporated/DMC2400UV-7?qs=sGAEpiMZZMshyDBzk1%2FWi5951hX7lZy1gw9GgZIwPcI%3D, Mouser number=21-DMC2400UV-7, Part Description="MOSFETs N and P-channel (Dual); 20V, 1A; ESD protected", Part number=DMC2400UV-7, Price per 1p (1), $=0.38, Price per 1p (1000), $=0.08
Q6 Q7 Q8 Q9 Q10 Q11 Q12 Q13: "MOSFET N-chanel, 150V, 240A, 4.4mOhm", Manufacturer=IXYS, Package/Case=TO247-3, Alternative="IRFP3077PbF, IRFP4568PbF", CompType=Transistor, Datasheet link=https://www.littelfuse.com/~/media/electronics/datasheets/discrete_mosfets/littelfuse_discrete_mosfets_n-channel_ultra_junction_ixt_240n15x4_datasheet.pdf.pdf, Digikey link=https://www.digikey.com/en/products/detail/ixys/IXTH240N15X4/10222203?s=N4IgTCBcDaIJIA0AqAJMAWADAOQIwFYF0QBdAXyA, Digikey number=IXTH240N15X4-ND, Mouser link=https://www.mouser.com/ProductDetail/IXYS/IXTH240N15X4?qs=T3oQrply3y%252BbuTinOhn9MQ%3D%3D, Mouser number=747-IXTH240N15X4, Part Description="MOSFET N-chanel, 150V, 240A, 4.4mOhm", Part number=IXTH240N15X4, Price per 1p (1), $=11.4, Price per 1p (1000), $=7.4
R1 R4 R7 R11 R13 R24 R28 R41 R42 R44 R46 R54 R57 R58 R61 R76 R77 R78 R79 R80 R81 R83 R85 R86 R99 R102 R113 R116 R119 R120: library part R0603, "Resistor 0603", Manufacturer=Panasonic, Package/Case=SMD0603, Part number=ERJ-3EKF1002V, Value1=1%, Value2=100ppm, Value3=0.1W, CompType=Resistor, Datasheet link=https://industrial.panasonic.com/cdbs/www-data/pdf/RDA0000/AOA0000C304.pdf, Digikey link=https://www.digikey.com/product-detail/en/panasonic-electronic-components/ERJ-3EKF1002V/P10-0KHCT-ND/198102, Digikey number=P10.0KHCT-ND, Mouser link=https://www.mouser.com/ProductDetail/Panasonic/ERJ-3EKF1002V?qs=%2Fha2pyFaduglTbPDDZSypQEDK4AiCVGrTuiUVobO5VAELetEuVDpZg%3D%3D, Mouser number=667-ERJ-3EKF1002V, Part Description="10kOhm 1% 100ppm 0.1W", Price per 1p (1), $=0.1, Price per 1p (1000), $=0.006
R2 R3 R6 R8 R12 R14 R16 R17 R21 R22 R23 R27 R32 R35 R38 R39 R43 R55 R68 R74 R75 R89 R90 R91 R92 R103 R104 R105 R106: library part R0603, "Resistor 0603", Manufacturer=Panasonic, Package/Case=SMD0603, Part number=ERJ-3EKF1001V, Value1=1%, Value2=100ppm, Value3=0.1W, CompType=Resistor, Datasheet link=https://industrial.panasonic.com/cdbs/www-data/pdf/RDA0000/AOA0000C304.pdf, Digikey link=https://www.digikey.com/product-detail/en/panasonic-electronic-components/ERJ-3EKF1001V/P1-00KHCT-ND/198071, Digikey number=P1.00KHCT-ND, Mouser link=https://www.mouser.com/ProductDetail/Panasonic/ERJ-3EKF1001V?qs=%2Fha2pyFaduglTbPDDZSypWE69I9nzuoo3rS5%252BQlSb3G8fLmmMx%252BY%2Fg%3D%3D, Mouser number=667-ERJ-3EKF1001V, Part Description="1kOhm 1% 100ppm 0.1W", Price per 1p (1), $=0.1, Price per 1p (1000), $=0.006
R5 R9 R10 R15 R18 R20 R26 R29 R30 R31 R33: library part R0603, "Resistor 0603", Manufacturer=Panasonic, Package/Case=SMD0603, Part number=ERJ-3EKF10R0V, Value1=1%, Value2=100ppm, Value3=0.1W, CompType=Resistor, Datasheet link=https://industrial.panasonic.com/cdbs/www-data/pdf/RDA0000/AOA0000C304.pdf, Digikey link=https://www.digikey.com/en/products/detail/panasonic-electronic-components/ERJ-3EKF10R0V/196065?s=N4IgjCBcoMxaBjKAzAhgGwM4FMA0IB7KAbXDBggF18AHAFyhAGU6AnASwDsBzEAX3xgAbPBBJIaLHkIkQMAJwAmACwjqIeoxYce-fIoAMADgCso8ZJz4ikUmAMACAPIALALaYQ6zZBABVTnY6J2QAWWxUTABXVmw9EABaCGgxFAwrGVtwAy8BRLMUi3TpG1JFXPwE5XM0qWtZIyMheThKPnagA, Digikey number=P10.0HCT-ND, Mouser link=https://www.mouser.com/ProductDetail/Panasonic/ERJ-3EKF10R0V?qs=%2Fha2pyFaduglTbPDDZSypfuBBJ3Lq12WHUiEi8qGz9yROtBrwXzvTA%3D%3D, Mouser number=667-ERJ-3EKF10R0V, Part Description="10Ohm 1% 100ppm 0.1W", Price per 1p (1), $=0.1, Price per 1p (1000), $=0.006
R19 R37 R51 R52 R56 R59 R65 R66: library part R0603, "Resistor 0603", Manufacturer=Panasonic, Package/Case=SMD0603, Part number=ERJ-3EKF2000V, Value1=1%, Value2=100ppm, Value3=0.1W, CompType=Resistor, Datasheet link=https://industrial.panasonic.com/cdbs/www-data/pdf/RDA0000/AOA0000C304.pdf, Digikey link=https://www.digikey.com/en/products/detail/panasonic-electronic-components/ERJ-3EKF2000V/196205?s=N4IgjCBcoMxaBjKAzAhgGwM4FMA0IB7KAbXDBggF18AHAFyhAGU6AnASwDsBzEAX3xgAbPBBJIaLHkIkQMAJwAmACwjqIeoxYce-fIoAMADgCso8ZJz4ikUoYMACAPIALALaYQ6zZBABVTnY6J2QAWWxUTABXVmw9EABaCGgxFAwrGVtwAy8BRLMUi3TpGztc-ATlczSpa1kjIyF5OEo%2BNqA, Digikey number=P200HCT-ND, Mouser link=https://www.mouser.com/ProductDetail/Panasonic/ERJ-3EKF2000V?qs=%2Fha2pyFaduglTbPDDZSypTlJuUp802sug%252BZ8t9IKAO7sPqzuSL5OBw%3D%3D, Mouser number=667-ERJ-3EKF2000V, Part Description="200Ohm 1% 100ppm 0.1W", Price per 1p (1), $=0.10, Price per 1p (1000), $=0.006
R25 R36 R40 R45 R47 R49 R50 R53 R63 R64 R67 R73 R82 R84 R93 R94 R107 R108 R117: library part R0603, "Resistor 0603", Manufacturer=Panasonic, Package/Case=SMD0603, Part number=ERJ-3EKF1000V, Value1=1%, Value2=100ppm, Value3=0.1W, CompType=Resistor, Datasheet link=https://industrial.panasonic.com/cdbs/www-data/pdf/RDA0000/AOA0000C304.pdf, Digikey link=https://www.digikey.com/product-detail/en/panasonic-electronic-components/ERJ-3EKF1000V/P100HCT-ND/198109, Digikey number=P100HCT-ND, Mouser link=https://www.mouser.com/ProductDetail/Panasonic/ERJ-3EKF1000V?qs=%2Fha2pyFaduglTbPDDZSypXi%252B1JYi5TJRT2R7dib9ms%2F8H45gLlep%2Fg%3D%3D, Mouser number=667-ERJ-3EKF1000V, Part Description="100Ohm 1% 100ppm 0.1W", Price per 1p (1), $=0.1, Price per 1p (1000), $=0.006
R34: library part R0603, "Resistor 0603", Manufacturer=Panasonic, Package/Case=SMD0603, Part number=ERJ-U03J105V, Value1=5%, Value2=200ppm, Value3=0.1W, CompType=Resistor, Datasheet link=https://industrial.panasonic.com/cdbs/www-data/pdf/RDP0000/AOA0000C334.pdf, Digikey link=https://www.digikey.com/en/products/detail/panasonic-electronic-components/ERJ-U03J105V/11636001?s=N4IgTCBcDaIKICUBSBaAqgBgMxIIwYFYA1EAXQF8g, Digikey number=10-ERJ-U03J105VCT-ND, Mouser link=https://ru.mouser.com/ProductDetail/Panasonic/ERJ-U03J105V?qs=%2Fha2pyFadug5vay0LVPFEGZE3WVfq9vNl60vmRtUkQUgOMaxdSjleA%3D%3D, Mouser number=667-ERJ-U03J105V, Part Description="1MOhm 5% 200ppm 0.1W", Price per 1p (1), $=0.1, Price per 1p (1000), $=0.015
R48: library part R0603, "Resistor 0603", Manufacturer=Panasonic, Package/Case=SMD0603, Part number=ERJ-3EKF2201V, Value1=1%, Value2=100ppm, Value3=0.1W, CompType=Resistor, Datasheet link=https://industrial.panasonic.com/cdbs/www-data/pdf/RDA0000/AOA0000C304.pdf, Digikey link=https://www.digikey.com/en/products/detail/panasonic-electronic-components/ERJ-3EKF2201V/1024416?s=N4IgjCBcoMxaBjKAzAhgGwM4FMA0IB7KAbXDBggF18AHAFyhAGU6AnASwDsBzEAX3xgAbPBBJIaLHkIkQMAJwAmACwjqIeoxYce-fIoAMADgCso8ZJz4ikUooB0igAQBrAPIALALaYQ6zZAgAKqc7HRuyACy2KiYAK6s2HogALQQ0GIoGFYytuAGfgKpZhkW2dI2doX4KcrmWVLWskZGQvJwlHxdQA, Digikey number=P2.20KHCT-ND, Mouser link=https://www.mouser.com/ProductDetail/Panasonic/ERJ-3EKF2201V?qs=%2Fha2pyFaduglTbPDDZSypdlzcSUHtWmk7K2%2FcZcYmRHFyCiQ7nctNA%3D%3D, Mouser number=667-ERJ-3EKF2201V, Part Description="2.2kOhm 1% 100ppm 0.1W", Price per 1p (1), $=0.1, Price per 1p (1000), $=0.006
R60: library part R0603, "Resistor 0603", Manufacturer=Panasonic, Package/Case=SMD0603, Part number=ERJ-3EKF2202V, Value1=1%, Value2=100ppm, Value3=0.1W, CompType=Resistor, Datasheet link=https://industrial.panasonic.com/cdbs/www-data/pdf/RDA0000/AOA0000C304.pdf, Digikey link=https://www.digikey.com/en/products/detail/panasonic-electronic-components/ERJ-3EKF2202V/1746336?s=N4IgjCBcoMxaBjKAzAhgGwM4FMA0IB7KAbXDBggF18AHAFyhAGU6AnASwDsBzEAX3wAmAAwAOAKzwQSSGix5CJEIMEACANYB5ABYBbTCGoh6jAKqd2dTcgCy2VJgCurbP3wBaCNGkoMOfESQpGDChgIg7pLeMnL%2BikHKYR4ALFIxfgqBpKKiAGwAnHCUfCVAA, Digikey number=P22.0KHCT-ND, Mouser link=https://www.mouser.com/ProductDetail/Panasonic/ERJ-3EKF2202V?qs=%2Fha2pyFaduglTbPDDZSypU%252Bx0GcyATS6XsOLBC6vVxkNE7ErsaOWqQ%3D%3D, Mouser number=667-ERJ-3EKF2202V, Part Description="22kOhm 1% 100ppm 0.1W", Price per 1p (1), $=0.1, Price per 1p (1000), $=0.006
R62: library part R0603, "Resistor 0603", Manufacturer=Panasonic, Package/Case=SMD0603, Part number=ERJ-3EKF4302V, Value1=1%, Value2=100ppm, Value3=0.1W, CompType=Resistor, Datasheet link=https://industrial.panasonic.com/cdbs/www-data/pdf/RDA0000/AOA0000C304.pdf, Digikey link=https://www.digikey.com/en/products/detail/panasonic-electronic-components/ERJ-3EKF4302V/1746411?s=N4IgjCBcoMxaBjKAzAhgGwM4FMA0IB7KAbXDBggF18AHAFyhAGU6AnASwDsBzEAX3wAmAAwAOAKzwQSSGix5CJEABYYAAgDWAeQAWAW0whqIeowCqndnS3IAstlSYArq2z98AWgjRpKDDnwiSFIwYSMBEA9JHxk5AMVgkEFwz2UpWP8FINJRUQA2AE44Sj5SoA, Digikey number=P43.0KHCT-ND, Mouser link=https://www.mouser.com/ProductDetail/Panasonic/ERJ-3EKF4302V?qs=%2Fha2pyFaduglTbPDDZSypVo23XfhD7yLD%252Bu9F9maZUMGPBH5Z7K5TQ%3D%3D, Mouser number=667-ERJ-3EKF4302V, Part Description="43kOhm 1% 100ppm 0.1W", Price per 1p (1), $=0.1, Price per 1p (1000), $=0.006
R69 R70 R71 R72: library part R0603, "Resistor 0603", Manufacturer=Panasonic, Package/Case=SMD0603, Part number=ERJ-3EKF3301V, Value1=1%, Value2=100ppm, Value3=0.1W, CompType=Resistor, Datasheet link=https://industrial.panasonic.com/cdbs/www-data/pdf/RDA0000/AOA0000C304.pdf, Digikey link=https://www.digikey.com/en/products/detail/panasonic-electronic-components/ERJ-3EKF3301V/1746376?s=N4IgjCBcoMxaBjKAzAhgGwM4FMA0IB7KAbXDBggF18AHAFyhAGU6AnASwDsBzEAX3xgAbPBBJIaLHkIkQMAJwAmACwjqIeoxYce-fIoAMADgCso8ZJz4ikUjAB0MAAQBrAPIALALaYQ6zZAgAKqc7HRuyACy2KiYAK6s2HogALQQ0GIoGFYytuAGfgKpZhkW2dI2pIqF%2BCnK5llS1rJGRkLycJR83UA, Digikey number=P3.30KHCT-ND, Mouser link=https://www.mouser.com/ProductDetail/Panasonic/ERJ-3EKF3301V?qs=%2Fha2pyFaduglTbPDDZSypYJmhYTkVTyjfCeV0Zc08WYMnqzgMDWrag%3D%3D, Mouser number=667-ERJ-3EKF3301V, Part Description="3.3kOhm 1% 100ppm 0.1W", Price per 1p (1), $=0.1, Price per 1p (1000), $=0.006
R87 R88 R122 R123: library part R0603, "Resistor 0603", Manufacturer=Panasonic, Package/Case=SMD0603, Part number=ERJ-3EKF5101V, Value1=1%, Value2=100ppm, Value3=0.1W, CompType=Resistor, Datasheet link=https://industrial.panasonic.com/cdbs/www-data/pdf/RDA0000/AOA0000C304.pdf, Digikey link=https://www.digikey.com/en/products/detail/panasonic-electronic-components/ERJ-3EKF5101V/1746427?s=N4IgjCBcoMxaBjKAzAhgGwM4FMA0IB7KAbXDBggF18AHAFyhAGU6AnASwDsBzEAX3xgAbPBBJIaLHkIkQMAJwAmACwjqIeoxYce-fIoAMADgCso8ZJz4ikUiYB0YAAQBrAPIALALaYQ6zZAgAKqc7HRuyACy2KiYAK6s2HogALQQ0GIoGFYytuAGfgKpZhkW2dI2pIqF%2BCnK5llS1rJGRkLycJR83UA, Digikey number=P5.10KHCT-ND, Mouser link=https://www.mouser.com/ProductDetail/Panasonic/ERJ-3EKF5101V?qs=%2Fha2pyFaduglTbPDDZSypWQJ%2FXQigzH6ZfrMId1zsTYqwog%252B7gPcvA%3D%3D, Mouser number=667-ERJ-3EKF5101V, Part Description="5.1kOhm 1% 100ppm 0.1W", Price per 1p (1), $=0.1, Price per 1p (1000), $=0.006
R95 R96 R97 R98 R109 R110 R111 R112: library part R0805, "Resistor 0805", Manufacturer=Panasonic, Package/Case=SMD0805, Part number=ERJ-6RQF1R0V, Value1=1%, Value2=100ppm, Value3=0.1W, CompType=Resistor, Datasheet link=https://industrial.panasonic.com/cdbs/www-data/pdf/RDN0000/AOA0000C313.pdf, Digikey link=https://www.digikey.com/en/products/detail/panasonic-electronic-components/ERJ-6RQF1R0V/250172, Digikey number=P1.0DCT-ND, Mouser link=https://www.mouser.com/ProductDetail/Panasonic/ERJ-6RQF1R0V?qs=%2Fha2pyFadui47ij%252B%252BE9lBN0XcJCSMm0uU%2Fu9U3%2F7zYb1i2ShqkJvag%3D%3D, Mouser number=667-ERJ-6RQF1R0V, Part Description="1Ohm 1% 100ppm 0.1W", Price per 1p (1), $=0.32, Price per 1p (1000), $=0.04
R100 R101 R114 R115: library part R2512, "Resistor 2512", Manufacturer=Panasonic, Package/Case=SMD2512, Part number=ERJ-1TYJ510U, Value1=5%, Value2=200ppm, Value3=1W, CompType=Resistor, Datasheet link=https://media.digikey.com/pdf/Data%20Sheets/Panasonic%20Resistors%20Thermistors%20PDFs/ERJ-xG,14,12(Z),1T_Rev_Apr_2015.pdf, Digikey link=https://www.digikey.com/en/products/detail/panasonic-electronic-components/ERJ-1TYJ510U/365222?s=N4IgjCBcoMxaBjKAzAhgGwM4FMA0IB7KAbRACYBWABjgF18AHAFyhAGUmAnASwDsBzEAF98YAGzwQSSGix5CJcBQDsAFhoh6IZqw48Bw-GSoAOCpOmyc%2BIpFIUwAAgDyACwC2mTYxaQQAVV5uJmdkAFlsVEA, Digikey number=PT51XCT-ND, Mouser link=https://www.mouser.com/ProductDetail/Panasonic/ERJ-1TYJ510U?qs=%2Fha2pyFaduj0UMXbjtMq91oGO475YlinjxD%252B84oJ%2FazDLcOO79sIVw%3D%3D, Mouser number=667-ERJ-1TYJ510U, Part Description="51Ohm 5% 200ppm 1W", Price per 1p (1), $=0.43, Price per 1p (1000), $=0.07
R118: library part R2728, "Resistor 2728", Manufacturer=Stackpole, Package/Case=SMD2728, Part number=CSSH2728FT5L00, Value1=1%, Value2=25ppm, Value3=4W, CompType=Resistor, Datasheet link=https://www.seielect.com/catalog/sei-css_cssh.pdf, Digikey link=https://www.digikey.com/en/products/detail/stackpole-electronics-inc/CSSH2728FT5L00/1923229?s=N4IgTCBcDaIMIGUEAkwHYwA4BiAVArADIAMxIAugL5A, Digikey number=CSSH2728FT5L00CT-ND, Mouser link=-, Mouser number=-, Part Description="5mOhms 1% 25ppm 4W", Price per 1p (1), $=1.0, Price per 1p (1000), $=0.4
R121: library part R0805, "Resistor 0805", Manufacturer=Panasonic, Package/Case=SMD0805, Part number=ERJ-6GEY0R00V, CompType=Resistor, Datasheet link=https://industrial.panasonic.com/cdbs/www-data/pdf/RDA0000/AOA0000C301.pdf, Digikey link=https://www.digikey.com/en/products/detail/panasonic-electronic-components/ERJ-6GEY0R00V/78163, Digikey number=P0.0ACT-ND, Mouser link=https://www.mouser.com/ProductDetail/Panasonic/ERJ-6GEY0R00V?qs=%2Fha2pyFaduiXHwl36i8QX36wZiKzn6ZC%252B%2FXCfh2OMu8zsRglrEz3MQ%3D%3D, Mouser number=667-ERJ-6GEY0R00V, Part Description=0Ohm, Price per 1p (1), $=0.1, Price per 1p (1000), $=0.01
RT1 RT2 RT3 RT4: library part B57861S0103J040, "Thermistor NTC 10k 5%", Manufacturer=TDK-EPCOS, Package/Case="Through hole", Value1=5%, Value2=3988K, Value3=60mW, Alternative=NTCG104ED104DT1X, CompType=Thermistor, Datasheet link=https://www.tdk-electronics.tdk.com/inf/50/db/ntc/NTC_Mini_sensors_S861.pdf, Digikey link=https://www.digikey.com/en/products/detail/epcos-tdk-electronics/B57861S0103J040/3500452?s=N4IgTCBcDaIEIFYDsAOAbARgMoAYM4GYApHAFhxAF0BfIA, Digikey number=495-75200-ND, Mouser link=https://www.mouser.com/ProductDetail/EPCOS-TDK/B57861S0103J040?qs=%2Fha2pyFadujntv0e0iDVKOWqU6ne%252BuLwIPAsv4SnY6MEOfaNDodXpA%3D%3D, Mouser number=871-B57861S103J40, Part Description="NTC resistor 10kOhm 5% 3988K", Part number=B57861S0103J040, Price per 1p (1), $=1.89, Price per 1p (1000), $=0.8
SW1: "Switch ON-ON 0.3A 50V", Manufacturer=E-Switch, Package/Case="Through Hole, Right Angle", CompType=Switch, Datasheet link=https://sten-eswitch-13110800-production.s3.amazonaws.com/system/asset/product_line/data_sheet/119/EG.pdf, Digikey link=https://www.digikey.com/en/products/detail/e-switch/EG2208A/301964?s=N4IgTCBcDaIKIHExgAwA4CCIC6BfIA, Digikey number=EG1942-ND, Mouser link=https://www.mouser.com/ProductDetail/E-Switch/EG2208A?qs=%2Fha2pyFadugmSmP5bEvz77wGRyMPQnrU%2F%2FKuNM2THIw%3D, Mouser number=612-EG2208A, Part Description="Switch ON-ON 0.3A 50V", Part number=EG2208A, Price per 1p (1), $=0.82, Price per 1p (1000), $=0.5
TP1 TP2 TP3 TP4 TP5 TP6 TP7 TP8 TP9 TP10 TP11 TP12 TP13 TP14: library part "TEST POINT", "Test point", Package/Case=-, Value1=0.8mm, Value2=1.4mm, CompType=Hole
U1: "DC/DC Conv., Non-Iso, 12V, 1A", Manufacturer="Traco Power", Package/Case=SIP-3, CompType="DC/DC Converters", Datasheet link=https://www.tracopower.com/sites/default/files/products/datasheets/tsr1_datasheet.pdf, Digikey link=https://www.digikey.com/en/products/detail/traco-power/TSR-1-24120/9383773, Digikey number=1951-2739-ND, Mouser link=https://www.mouser.com/ProductDetail/TRACO-Power/TSR-1-24120?qs=ckJk83FOD0XFyuKFnkiJHw%3D%3D, Mouser number=495-TSR-1-24120, Part Description="DC/DC Conv., Non-Iso, 12V, 1A", Part number="TSR 1-24120", Price per 1p (1), $=5.5, Price per 1p (1000), $=4.1
U2: "DC/DC Conv., Non-Iso, 5.0V, 1A", Manufacturer="Traco Power", Package/Case=SIP-3, CompType="DC/DC Converters", Datasheet link=https://www.tracopower.com/sites/default/files/products/datasheets/tsr1_datasheet.pdf, Digikey link=https://www.digikey.com/en/products/detail/traco-power/TSR-1-2450/9383780, Digikey number=1951-2747-ND, Mouser link=https://www.mouser.com/ProductDetail/TRACO-Power/TSR-1-2450?qs=ckJk83FOD0XFKqda0Mzkgw%3D%3D, Mouser number=495-TSR-1-2450, Part Description="DC/DC Conv., Non-Iso, 5.0V, 1A", Part number="TSR 1-2450", Price per 1p (1), $=5.5, Price per 1p (1000), $=4.1
U3: "LDO 3.3V 500mA", Manufacturer=STM, Package/Case=DFN-6, CompType="Integrated circuit", Datasheet link=https://www.st.com/content/ccc/resource/technical/document/datasheet/12/43/cc/93/21/f6/41/66/CD00227527.pdf/files/CD00227527.pdf/jcr:content/translations/en.CD00227527.pdf, Digikey link=https://www.digikey.com/en/products/detail/stmicroelectronics/LD39050PU33R/2039876, Digikey number=497-8716-1-ND, Mouser link=https://www.mouser.com/ProductDetail/STMicroelectronics/LD39050PU33R?qs=%2Fha2pyFadujCURFU6JT6zdCg5MoSZujIJpCj1jzTgayb3edzjbabLA%3D%3D, Mouser number=511-LD39050PU33R, Part Description="LDO 3.3V 500mA", Part number=LD39050PU33R, Price per 1p (1), $=1.15, Price per 1p (1000), $=0.58
U4: "ARM Cortex-M4+ STM32F3 Microcontroller IC 32-Bit 72MHz 64KB", Manufacturer=STMicroelectronics, Package/Case=LQFP-64, CompType="Integrated circuit", Datasheet link=https://www.st.com/content/ccc/resource/technical/document/datasheet/d1/cd/3d/18/a2/2c/4e/d0/DM00097745.pdf/files/DM00097745.pdf/jcr:content/translations/en.DM00097745.pdf, Digikey link=https://www.digikey.com/en/products/detail/stmicroelectronics/STM32F334R8T7/5268274, Digikey number=497-18933-ND, Mouser link=https://www.mouser.com/ProductDetail/STMicroelectronics/STM32F334R8T7?qs=9MuLHSklicpmYDk0V9oFMQ%3D%3D, Mouser number=511-STM32F334R8T7, Part Description="Microcontroller IC 32-Bit 72MHz 64KB", Part number=STM32F334R8T7, Price per 1p (1), $=7.17, Price per 1p (1000), $=4.0
U5: "OpAmp Rail-to-Rail 1 Channel", Manufacturer="Analog Devices", Package/Case=TSOT23-5, CompType="Integrated circuit", Datasheet link=https://www.analog.com/media/en/technical-documentation/data-sheets/AD8628_8629_8630.pdf, Digikey link=https://www.digikey.com/en/products/detail/analog-devices-inc/AD8628AUJZ-REEL7/996267, Digikey number=AD8628AUJZ-REEL7CT-ND, Mouser link=https://www.mouser.com/ProductDetail/Analog-Devices/AD8628AUJZ-REEL7?qs=%2FtpEQrCGXCwiRJmva1wT4g%3D%3D, Mouser number=584-AD8628AUJZ-R7, Part Description="OpAmp Rail-to-Rail 1 Channel", Part number=AD8628AUJZ, Price per 1p (1), $=2.63, Price per 1p (1000), $=1.28
U6: "Interface USB to UART", Manufacturer="Silicon Labs", Package/Case=QFN-28, CompType="Integrated circuit", Datasheet link=https://www.silabs.com/documents/public/data-sheets/CP2102-9.pdf, Digikey link=https://www.digikey.com/en/products/detail/silicon-labs/CP2102-GM/696598, Digikey number=336-1160-5-ND, Mouser link=https://www.mouser.com/ProductDetail/Silicon-Labs/CP2102-GM?qs=yHCtFi5ROqJvCcyR88R4Pg%3D%3D, Mouser number=634-CP2102-GM, Part Description="Interface USB to UART", Part number=CP2102-GM, Price per 1p (1), $=3.5, Price per 1p (1000), $=1.5
U7: "Digital Isolator I2C 2500Vrms 2 Channel 1Mbps", Manufacturer="Silicon Labs", Package/Case=SOIC-8, CompType="Integrated circuit", Datasheet link=https://www.ti.com/lit/ds/symlink/iso1540-q1.pdf?ts=1615839581838, Digikey link=https://www.digikey.com/en/products/detail/texas-instruments/ISO1540D/3601070, Digikey number=296-34896-5-ND, Mouser link=https://www.mouser.com/ProductDetail/Texas-Instruments/ISO1540D?qs=rg6Iqu58vpWvO86XnJi3%2Fg%3D%3D, Mouser number=595-ISO1540D, Part Description="Digital Isolator I2C 2500Vrms 2 Channel 1Mbps", Part number=ISO1540D, Price per 1p (1), $=5.73, Price per 1p (1000), $=2.87
U8 U11 U20 U21: "DC/DC Converter 6W 1.5kV Isolated", Manufacturer=Cincon, Package/Case=SIP-8, CompType="Integrated circuit", Datasheet link="https://www.cincon.com/productdownload/SPEC-EC4SAW-V12.pdf, https://www.cincon.com/productdownload/EC4SAW-SERIES-application-note.pdf", Digikey link=https://www.digikey.com/en/products/detail/cincon-electronics-co-ltd/EC4SAW-24S15N/9683268?s=N4IgTCBcDaIKIGEAsBlAggdQLRlQRgFYA5EAXQF8g, Digikey number=EC4SAW-24S15N, Mouser link=https://www.mouser.com/ProductDetail/Cincon/EC4SAW-24S15N?qs=%2Fha2pyFaduiGXo%2F8izrl2Opdn1C73MRZCbc2zfZkPUuoj8AECuablg%3D%3D, Mouser number=418-EC4SAW-24S15N, Part Description="DC/DC Converter 6W 1.5kV Isolated", Part number=EC4SAW-24S15N, Price per 1p (1), $=12.0, Price per 1p (1000), $=10.0
U9 U10 U22 U23: "LDO 5.0V 50mA", Manufacturer="Texas Instruments", Package/Case=SC70-5, CompType="Integrated circuit", Datasheet link=https://www.ti.com/lit/ds/symlink/tps715.pdf?HQS=dis-dk-null-digikeymode-dsf-pf-null-wwe&ts=1615331244877, Digikey link=https://www.digikey.com/en/products/detail/texas-instruments/TPS71550DCKR/562815, Digikey number=296-15046-1-ND, Mouser link=https://www.mouser.com/ProductDetail/Texas-Instruments/TPS71550DCKR?qs=Gse6rAGbi7%252BvaZj1yCtdfw%3D%3D, Mouser number=595-TPS71550DCKR, Part Description="LDO 3.3V 50mA", Part number=TPS71550DCKR, Price per 1p (1), $=0.74, Price per 1p (1000), $=0.28
U12 U13 U16 U17: "Digital Isolator 3750Vrms 2 Channel 150Mbps", Manufacturer="Silicon Labs", Package/Case=SOIC-8, CompType="Integrated circuit", Datasheet link=https://www.silabs.com/documents/public/data-sheets/si861x-2x-datasheet.pdf, Digikey link=https://www.digikey.com/en/products/detail/silicon-labs/SI8620BC-B-ISR/4069784?s=N4IgTCBcDaIMoEkAcA2MAGAQgYQLSdwTgCUQBdAXyA, Digikey number=336-4330-1-ND, Mouser link=https://www.mouser.com/ProductDetail/Silicon-Labs/SI8620BC-B-ISR?qs=%2Fha2pyFadugs6A4vvJm%252BGaYG0423mMcOc3j31Gp1kfaMtdbhcRq0kg%3D%3D, Mouser number=634-SI8620BC-B-ISR, Part Description="Digital Isolator 3750Vrms 2 Channel 150Mbps", Part number=SI8620BC-B-ISR, Price per 1p (1), $=1.25, Price per 1p (1000), $=1.15
U14 U15 U18 U19: "MOSFET Driver IC", Manufacturer=IXYS, Package/Case=TO263-5, Alternative=IXDN614YI, CompType="Integrated circuit", Datasheet link=https://www.ixysic.com/home/pdfs.nsf/0/18AB54BEE23C4E71852577520051C399/$file/IXD_614.pdf, Digikey link=https://www.digikey.com/en/products/detail/ixys-integrated-circuits-division/IXDD614YI/2391600?s=N4IgTCBcDaIJIA0AiSBsBGALATTiAugL5A, Digikey number=CLA338-ND, Mouser link=https://www.mouser.com/ProductDetail/IXYS-Integrated-Circuits/IXDD614YI/?qs=%2Fha2pyFaduiZAeBBqN5wty5ShYJ6%2FfWCWwL6htYUQeY%3D, Mouser number=849-IXDD614YI, Part Description="MOSFET Driver IC", Part number=IXDD614YI, Price per 1p (1), $=5.14, Price per 1p (1000), $=2.58
X1: library part 0353170420, "Connector Header 4 pin", Manufacturer=Molex, Package/Case="Through Hole", CompType=Connector, Datasheet link=https://www.molex.com/pdm_docs/sd/039281043_sd.pdf, Digikey link=https://www.digikey.com/en/products/detail/molex/0039281043/61400, Digikey number=WM3801-ND, Mating with="0039012040 + 4 x (0039000039)", Mouser link=https://www.mouser.com/ProductDetail/Molex/39-28-1043?qs=LQQHZ4xw2XCMHoV0KRLGhg%3D%3D, Mouser number=538-39-28-1043, Part Description="Connector Header 4 pin", Part number=0039281043, Price per 1p (1), $=0.75, Price per 1p (1000), $=0.38
X2 X4: "Connector 2 pin, Right angle, 2.54mm", Manufacturer=Connfly, Package/Case="Through Hole", CompType=Connector, Digikey link=-, Digikey number=-, Mouser link=-, Mouser number=-, Part Description="Connector 2 pin, Right angle, 2.54mm", Part number=WF-2R, Price per 1p (1), $=0.15, Price per 1p (1000), $=0.05, Text="\"text\""
X3 X5: "SMA Jack, Socket, Right Angle 50Ohm", Manufacturer=Samtec, Package/Case="Through Hole", CompType=Connector, Datasheet link=http://suddendocs.samtec.com/catalog_english/sma.pdf, Digikey link=https://www.digikey.com/en/products/detail/samtec-inc/SMA-J-P-H-RA-TH1/2664715, Digikey number=SAM8856-ND, Mating with=SMA-P-C-H-ST-CA1, Mouser link=https://www.mouser.com/ProductDetail/Samtec/SMA-J-P-H-RA-TH1?qs=%2Fha2pyFaduido7R%252BdeDRif5LX8zAwyx4ING7VZyWTo4ZBEJ7ms8AgA%3D%3D, Mouser number=200-SMAJPHRATH1, Part Description="SMA Jack, Socket, Right Angle 50Ohm", Part number=SMA-J-P-H-RA-TH1, Price per 1p (1), $=6.2, Price per 1p (1000), $=3.6
X6: "Battery holder for CR2032", Manufacturer=Keystone, Package/Case="Trough Hole-3", CompType=Connector, Datasheet link=http://www.keystoneelectronics.net/ENG._DEPT/WEB_ORACLE/PDF/PDF%20CAT%20NO%20DRAWINGS/1000-1999/1074.PDF, Digikey link=https://www.digikey.com/en/products/detail/keystone-electronics/1074/9921784, Digikey number=36-1074-ND, Mouser link=https://www.mouser.com/ProductDetail/Keystone-Electronics/1074?qs=u16ybLDytRZ%2FZj7HSRmD5g%3D%3D, Mouser number=534-1074, Part Description="Battery holder for CR2032", Part number=1074, Price per 1p (1), $=0.63, Price per 1p (1000), $=0.37
X7: library part "CONNECTOR-5 (2mm)", "Connector 5 holes 2mm", Package/Case=-, Value1=0.8mm, Value2=1.4mm, CompType=Connector
X8: "USB Type-C, Right Angle Receptacle 24 Position", Manufacturer=Stewart, Package/Case=SMD+TH, CompType=Connector, Datasheet link=https://belfuse.com/resources/drawings/stewartconnector/dr-stw-ss-52400-003.pdf, Digikey link=https://www.digikey.com/en/products/detail/stewart-connector/SS-52400-003/11205655?s=N4IgTCBcDaIMpwLQFYwBYAMHFYMwgF0BfIA, Digikey number=380-SS-52400-003CT-ND, Mating with="USB Type-C", Mouser link=https://www.mouser.com/ProductDetail/Stewart-Connector-Bel/SS-52400-003?qs=%2Fha2pyFaduih8cH%2F%2FY%2Fy80F9lcyWJekbo3AebMFU7YTl3sJ3rKtpvg%3D%3D, Mouser number=530-SS-52400-003, Part Description="USB Type-C, Right Angle Receptacle 24 Position", Part number=SS-52400-003, Price per 1p (1), $=2.25, Price per 1p (1000), $=1.25
X9: "Connector Header 4 pins, 2.0mm", Manufacturer=JST, Package/Case="Through Hole", CompType=Connector, Datasheet link=http://www.jst-mfg.com/product/pdf/eng/ePA-F.pdf, Digikey link=https://www.digikey.com/en/products/detail/jst-sales-america-inc/B04B-PASK-1-LF-SN/926740, Digikey number=455-1834-ND, Mating with=PAP-04V-S, Mouser link=-, Mouser number=-, Part Description="Connector Header 4 pins, 2.0mm", Part number=B04B-PASK-1(LF)(SN), Price per 1p (1), $=0.34, Price per 1p (1000), $=0.16